# Altium PCB PCB_PowerBoard_7500-0430.PcbDoc (part 4 of 5)
Units mil, origin at the board's own origin, x right, y up, seen from the top; angles counter-clockwise.
Board outline 4000 x 3250 mil, 4 copper layers (Top Layer, Layer 1, Layer 2, Bottom Layer), stack 62.449 mil thick; 205 components, 100 nets, 1585 pads, 235 vias.
Unrouted connection lines stored in the file: 2.
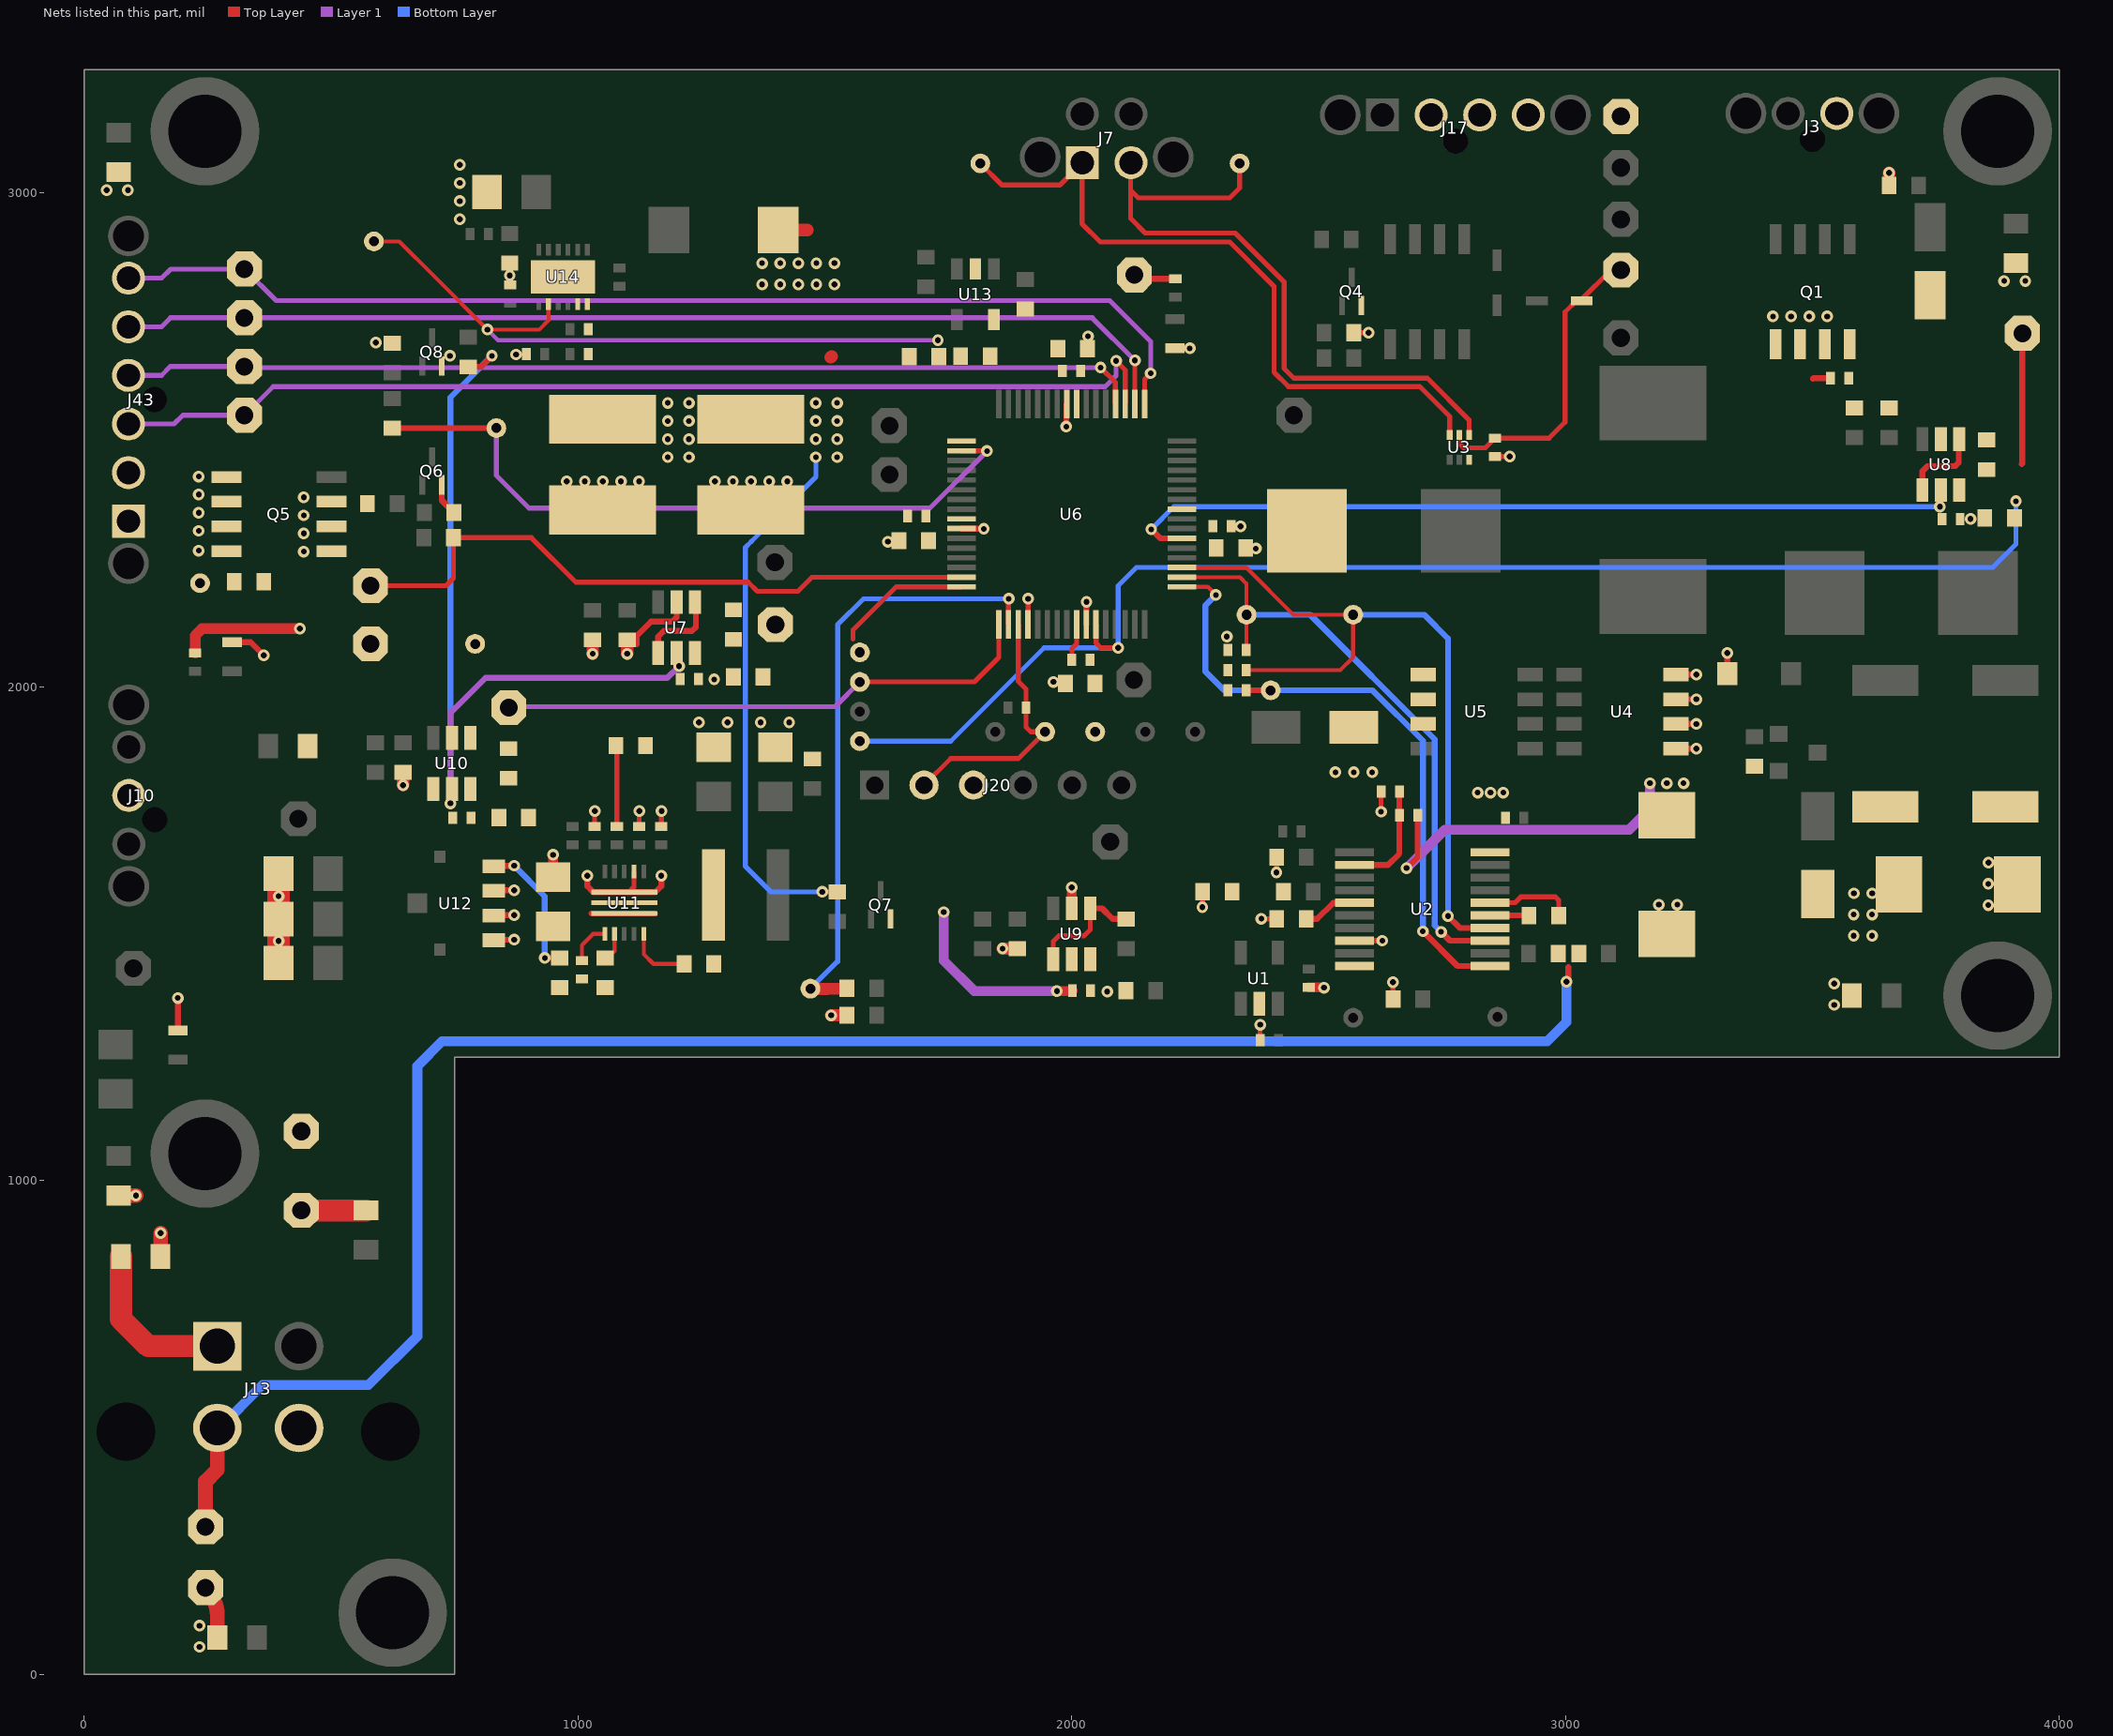
[diagram p4: the nets of this part, all layers, seen from the top]

## Via types
v1: diameter 23.62, hole 11.81, Top Layer to Bottom Layer, tented both sides, 232 vias
v2: diameter 23.62, hole 11.81, Top Layer to Bottom Layer, 3 vias

## Nets (pads, with @x,y where several pads share a name; then routed paths per layer and width w, separated by ;. In a path a pad name is that pad's centre, name@x,y a point inside that pad or via, vN(x,y) a via of type N, cw(c..) or ccw(c..) an arc to the next point about the centre after c; other vN are vias at no path point) (continued)
GND: (continued)
  Top Layer w10: R47.1@1034,1717.53 v1@1034,1748.05 ; U11.6@1103,1584.31 1113.68,1594.99 U11.2@1113.68,1625.65 ; R49.1@1124,1717.53 v1@1124,1748.05 ; R48.1@1169,1717.53 v1@1169,1748.05 ; U6.20@1911.89,2127.24 v1(1911.89,2178.47) ; C17.2@2000.5,2055 2000.5,2077.5 2009.84,2086.84 U6.25@2009.84,2126.77 ; LED2.2@2209,2685.47 v1(2239,2685.47) ; v1@2265,1554.5 C12.2@2265,1585 ; C5.2@2381.5,1285 2381.5,1315.5 v1(2382,1316) ; v1@2384.5,1530 C11.1@2415,1530 ; v1@2415,1624.5 C7.2@2415,1655 ; R16.2@2571,2717 v1(2601,2717) ; v1(2626.5,1747.19) C4.2@2626.5,1788 ; C8.1@2650.5,1368.5 v1(2650.5,1402) ; U2.16@2847.44,1562.8 2897.8,1562.8 2910,1575 2979,1575 2986,1568 C13.1@2986,1537 ; C3.2@2857,2466.5 v1(2887,2466.5)
  Top Layer w12: LED1.2@190,1304.53 v1(190,1370) ; LED3.2@300,2090.53 337.47,2090.53 v1(364,2064) ; Q6.2@724.37,2409 724.37,2377.63 R41.2@749,2353 ; v1(1019,1617.65) 1019,1596.31 1031,1584.31 1103,1584.31 1157,1584.31 1169,1596.31 v1(1169,1617.65) ; 1119,2086 1119,2103 1148,2132 1191,2132 1200,2141 U7.2@1200,2171.57
  Top Layer w20: C36.1@950,1615 v1(950,1660) ; U9.2@2000,1551.57 v1(2000,1594) ; C6.2@2480,1391.5 v1@2510.5,1391.5
  Top Layer w25: v1(646,1801) R37.1@646,1827 ; v1(1100,2067) R30.1@1100,2095 ; v1(1513,1335) R46.2@1545,1335 ; v1(1860,1470) R36.1@1890,1470 ; C2.1@3655,3015 v1(3655,3041)
  Top Layer w29.53: R10.1@155,846.69 v1(155,894)
  Top Layer w30: R18.1@70,970 v1(105,970) ; J15.1@246,176 cw(c188.06,118.06) 270,118.06 R17.1@270,75
  Top Layer w45: C40.1@394,1441 v1(394,1485.5) C39.1@394,1530 v1(394,1576) C38.1@394,1622
  other v1: 234,56 234,99 3544,1356 2072,1383 2511,1391 3544,1399 2384,1530.5 2264.5,1554 3856,1558 3189,1559 3226.27,1559 3856,1601 2414.5,1624 3856.27,1644 1034.47,1748.53 1124.47,1748.53 1169.47,1748.53 1245,1928 1303,1928 1370,1928 1428,1928 1963,2010 1276,2015 2373,2280 1628,2294 2342,2325 3820,2340 977.33,2416 1014,2416 1050.67,2416 1087.33,2416 1124,2416 1277.33,2416 1314,2416 1350.67,2416 1387.33,2416 1424,2416 741,2670.31 875,2673 591,2697 2033,2710 3888,2822 3931,2822 862,2832.88 761,2947 761,2983.67 46,3006 89,3006 761,3020.33 761,3057
IB_PWR_5V: C34.2 J43.1 J47.1 Q5.5 Q5.6 Q5.7 Q5.8
  other v1: 232.4,2276 232.4,2316 232.4,2352.67 232.4,2389.33 232.4,2426
IB_PWR_EN: J44.1 R39.1 U6.15 | length 1341.7
  Top Layer w10: J44.1@580,2205 733,2205 748,2220 R39.1@748,2302 906,2302 996,2212 1345,2212 1363.43,2193.57 1422.1,2193.57 1445.57,2193.57 1474.05,2222.05 U6.15@1776.77,2222.05
IB_SPI_MISO: J43.4 J49.1 U6.52 | length 2062.6
  Top Layer w10: v1(2058.5,2646.5) 2088.58,2616.42 U6.52@2088.58,2573.23
  Layer 1 w10: J43.4@90,2630.72 156.96,2630.72 174.91,2648.67 J49.1@325,2648.67 327.17,2646.5 v1(2058.5,2646.5)
IB_SPI_MOSI: J43.3 J48.1 U6.51 | length 2164.8
  Top Layer w10: v1(2090,2660) 2108.27,2641.73 U6.51@2108.27,2573.23
  Layer 1 w10: J43.3@90,2532.29 182.29,2532.29 200,2550 J48.1@325,2550 383,2608 2068,2608 2090,2630 v1(2090,2660)
IB_SPI_S\S\: J43.6 J51.1 U6.49 | length 2269.4
  Top Layer w10: U6.49@2147.64,2573.23 2147.64,2622.64 v1(2160,2635)
  Layer 1 w10: J43.6@90,2827.57 156.96,2827.57 175.39,2846 J51.1@325,2846 389,2782 2077,2782 2160,2699 v1(2160,2635)
IB_SPI_SCLK: J43.5 J50.1 U6.50 | length 2169
  Top Layer w10: U6.50@2128,2573.28 v1(2128,2661)
  Layer 1 w10: J43.5@90,2729.14 156.96,2729.14 175.15,2747.33 J50.1@325,2747.33 2041.67,2747.33 v1(2128,2661)
L1_OUT: C33.2 L2.2 U11.7 | length 17.5
  Top Layer w12: L2.2@1262.5,1562.66 L2.2@1274.84,1575
LED_BLK_LEAD: J7.2 J8.1 U3.4 | length 1385.8
  Top Layer w10: J7.2@2119.21,3061.57 2119.21,3005.79 ; J8.1@2340,3060 2340,3010 2320,2990 2135,2990 2119.21,3005.79 ; U3.4@2804.68,2510.12 2804.68,2540.32 2720,2625 2450,2625 2430,2645 2430,2820 2331,2919 2149,2919 2119.21,2948.79 2119.21,3005.79
LED_RED_LEAD: J6.1 J7.1 U3.6 | length 1412.8
  Top Layer w10: J6.1@1815,3060 1859,3016 1976,3016 J7.1@2020.79,3060.79 ; J7.1@2020.79,3061.57 J7.1@2020.79,3060.79 ; J7.1@2021.57,3061.57 J7.1@2020.79,3060.79 ; U3.6@2765.32,2510.12 2765.32,2547.68 2705,2608 2439,2608 2410,2637 2410,2811 2320,2901 2058,2901 2020.79,2938.21 J7.1@2020.79,3060.79
NetC4_1: C4.1 R2.1 U2.2 | length 225.9
  Top Layer w12: U2.2@2572.56,1639.57 2640.57,1639.57 2663.5,1662.5 C4.1@2663.5,1788
NetC10_1: C10.1 D1.1 U2.20
  other v1: 2822,1786 2848,1786 2874,1786 2534,1827 2571.22,1827.16 2608.44,1827.16
NetC11_2: C11.2 U2.5 | length 111.1
  Top Layer w12: C11.2@2475,1530 2497,1530 2529.8,1562.8 U2.5@2572.56,1562.8
NetC12_1: C12.1 R6.2
NetC13_2: C13.2 U2.15 | length 78.8
  Top Layer w12: U2.15@2847.44,1537.2 2926,1537.2 C13.2@2926,1537
NetC33_1: C33.1 U11.13 | length 130.8
  Top Layer w8: U11.13@1133.37,1499.66 1133.37,1458.63 1153,1439 C33.1@1215,1439
NetC35_2: C35.2 U11.10 | length 67.3
  Top Layer w8: C35.2@1051,1442 1074.32,1465.32 U11.10@1074.32,1499.66
NetC36_2: C36.2 C37.2 R43.2 U11.8 U12.1 U12.2 U12.3 | length 233
  Top Layer w12: U12.1@836,1488 v1(871,1488) ; U12.2@836,1538 v1(871,1538) ; U12.3@836,1588 v1(871,1588) ; U11.8@1028.01,1541.01 U11.8@1156,1541.01
NetC37_1: C37.1 R43.1 U11.9 U12.4 | length 371.3
  Top Layer w8: R43.1@1008,1446 1008,1477 1030.66,1499.66 U11.9@1054.63,1499.66
  Top Layer w10: U12.4@829.81,1637 U12.4@830.59,1637.78 ; v1@870.78,1637.78 v1(871,1638)
  Top Layer w12: U12.4@830.59,1637.78 v1@870.78,1637.78 ; v1(933,1451) C37.1@963,1451
  Bottom Layer w12: v1(871,1638) 933,1576 v1(933,1451)
NetC41_2: C41.2 R50.1 | length 164.3
  Top Layer w10: C41.2@1077,1881 1079,1879 R50.1@1079,1717.53